# Altium PCB power-board.PcbDoc
Units mm, origin at the board's own origin, x right, y up, seen from the top; angles counter-clockwise.
Board outline 80 x 65 mm, 2 copper layers (Top Layer, Bottom Layer); 24 components, 14 nets, 67 pads, 3 vias.
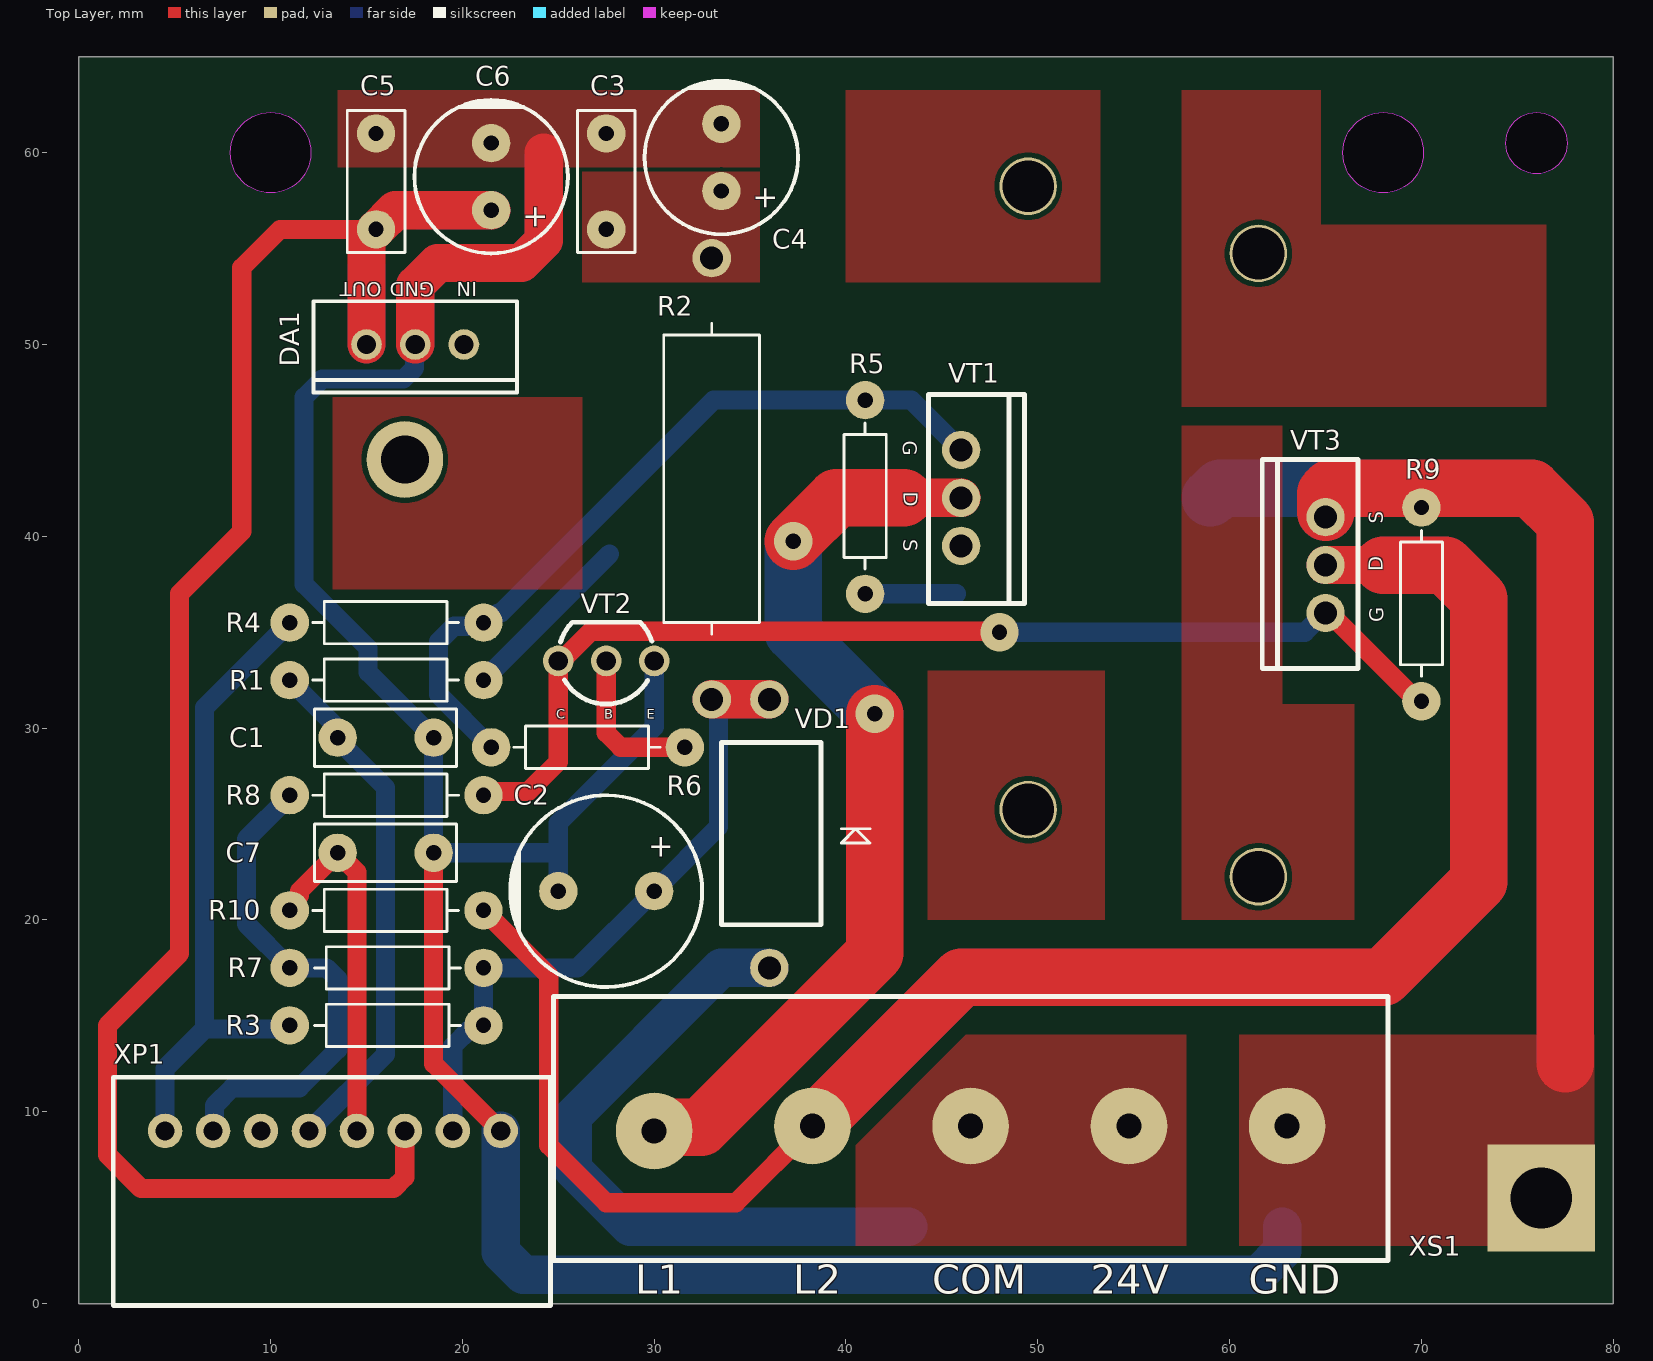
[diagram p0: Top Layer view]
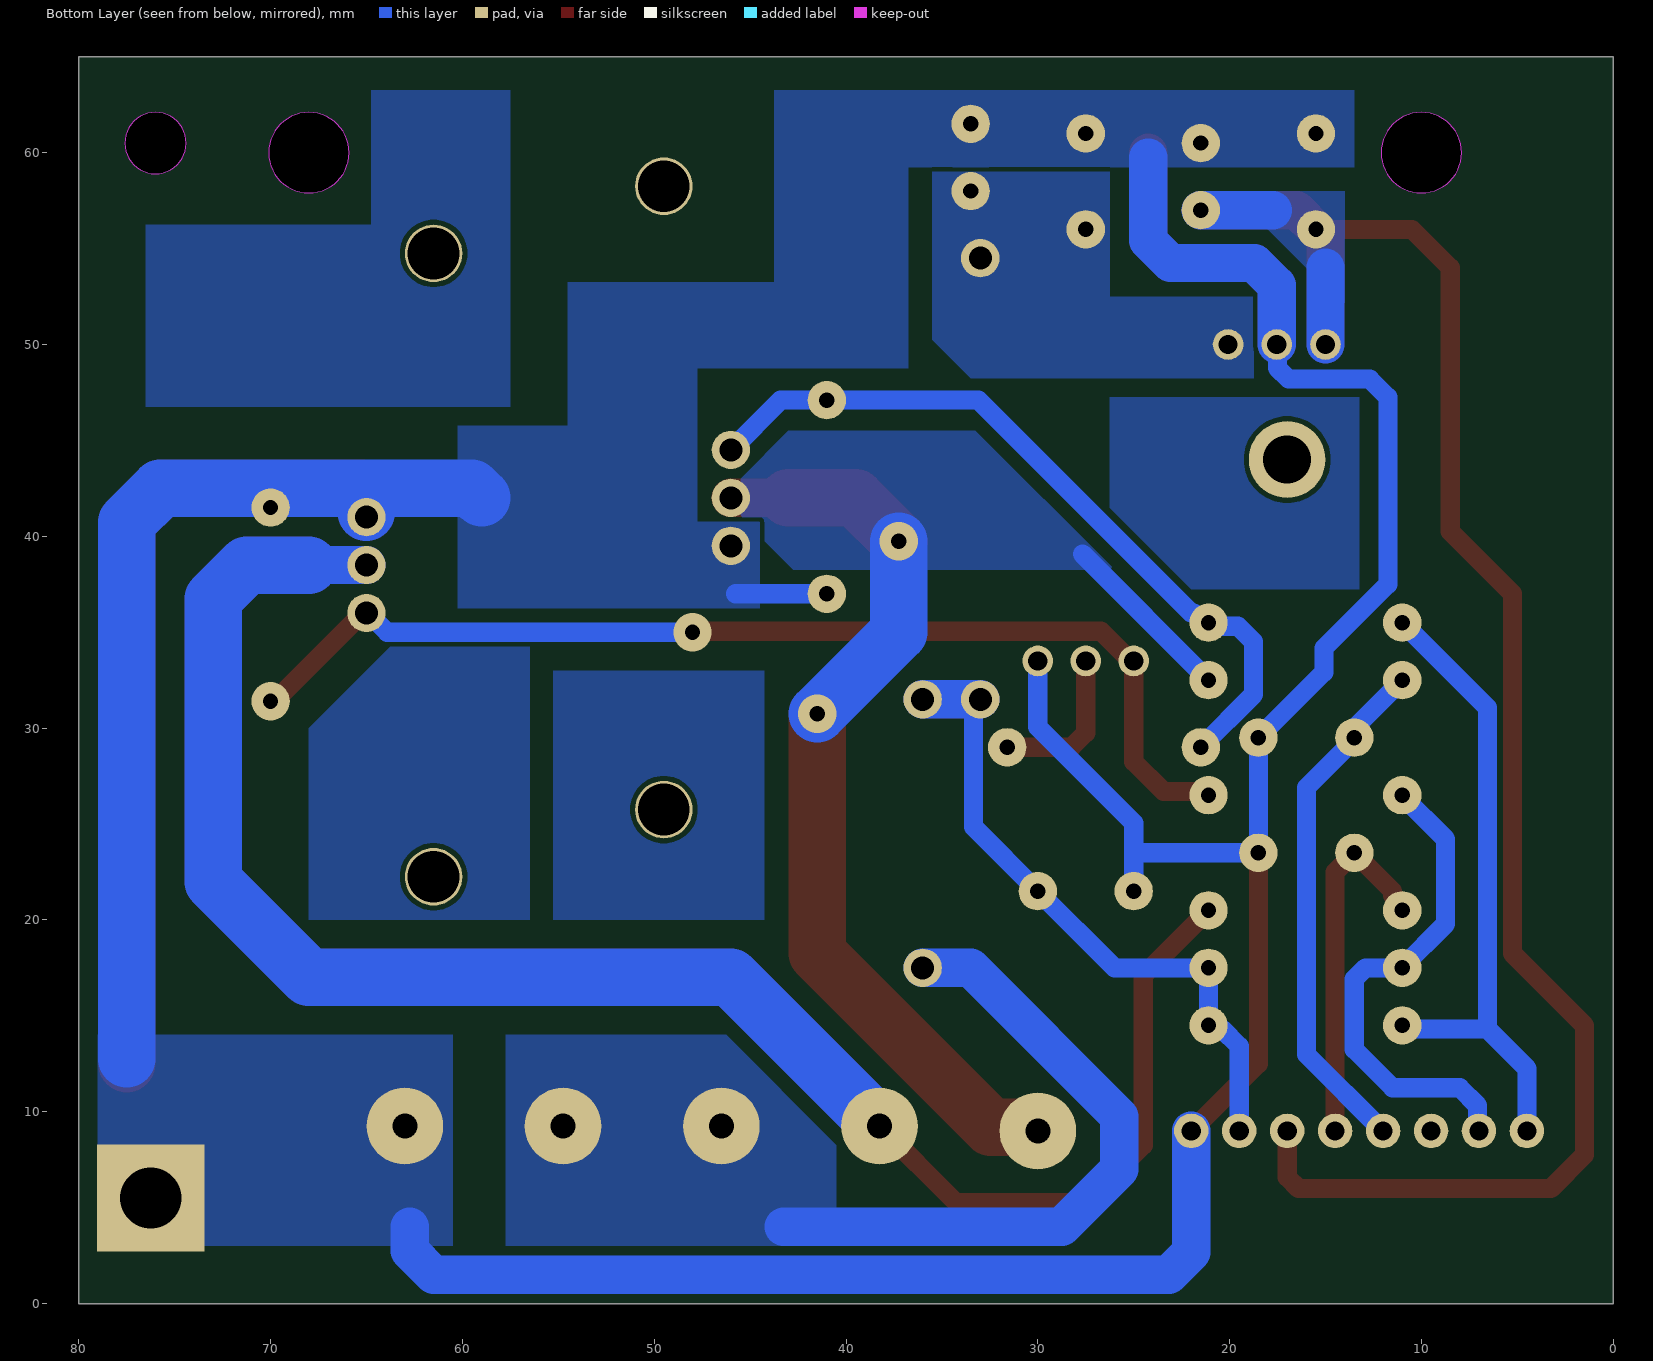
[diagram p1: Bottom Layer view, seen from below]
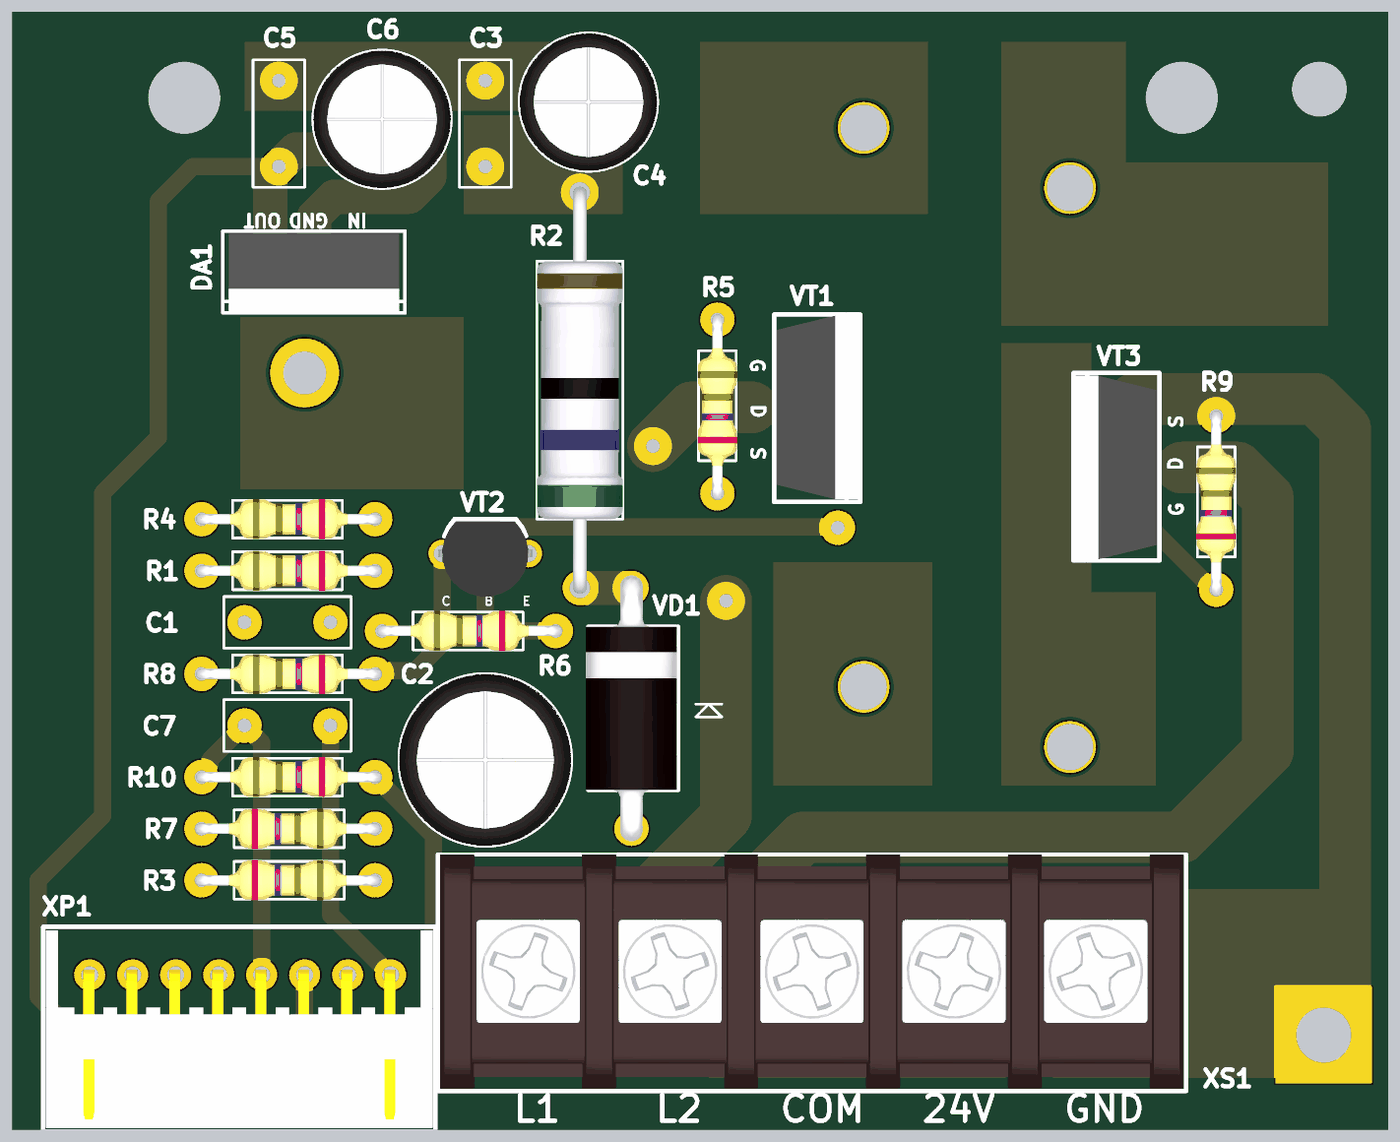
[diagram p2: 3D render of the assembled board from above, using the file's embedded part models]

## Layer stack, top to bottom
Top Solder: solder mask 0.0102, Solder Resist, Dk 3.5
Top Layer: signal copper 0.0356
Dielectric 1: dielectric 0.32, FR-4, Dk 4.8
Bottom Layer: signal copper 0.0356
Bottom Solder: solder mask 0.0102, Solder Resist, Dk 3.5

## Board outline
0,0 80,0 80,65 0,65
cut-out: 74.4,60.5 cw(c76,60.5) 76,62.1 cw(c76,60.5) 77.6,60.5 cw(c76,60.5) 76,58.9 cw(c76,60.5)
cut-out: 65.9,60 cw(c68,60) 68,62.1 cw(c68,60) 70.1,60 cw(c68,60) 68,57.9 cw(c68,57.9) 68,57.9 cw(c68,60)
cut-out: 7.9,60 cw(c10,60) 10,62.1 cw(c10,60) 12.1,60 cw(c10,60) 10,57.9 cw(c10,57.9) 10,57.9 cw(c10,60)

## Design rules (kind name [scope] priority, off if disabled: settings)
Clearance [All] p1: gap=0.25 ignorepadtopadclearanceinfootprint=FALSE
PolygonConnect [All] p1: connectstyle=Direct reliefconductorwidth=0.254 reliefentries=4 polygonreliefangle="90 Angle" airgapwidth=0.254
RoutingVias [All] p1: holewidth=0.711 width=1.27 viastyle="Through Hole" minholewidth=0.711 minwidth=1.27 maxholewidth=0.711 maxwidth=1.27
SolderMaskExpansion [All] p1: expansion=0.102 istentingtop=FALSE
Width "Width 1 Oz" [All] p1: maxlimit=10 minlimit=0.25 preferedwidth=1 checkconnectedcopper=TRUE
30 further rules are at their usual default settings.

## Components (designator, comment, footprint, x,y, rotation, side; value= is the part's Value field where it differs from the comment)
C1 "0.1 µF" C_MLCC 16,29.5 r180 top
C2 "470 µF" C_Polarized_D10_H16.5 27.5,21.5 r0 top
C3 "0.1 µF" C_MLCC 27.5,58.5 r270 top
C4 "330 µF" C_Polarized_D8_H16.5 33.5,59.75 r270 top
C5 "0.1 µF" C_MLCC 15.5,58.5 r270 top
C6 "470 µF" C_Polarized_D8_H13 21.5,58.75 r270 top
C7 "0.1 µF" C_MLCC 16,23.5 r180 top
DA1 "L7805CV-DG" DA_TO-220 17.54,50 r180 top
R1 "5.1 kΩ" R_CF-25_C1-4 16,32.5 r180 top
R2 "150 Ω" R_C2-23 33,43 r90 top
R3 "10 kΩ" R_CF-25_C1-4 16.1,14.5 r0 top
R4 "1 kΩ" R_CF-25_C1-4 16,35.5 r180 top
R5 "10 kΩ" R_CF-25_C1-4 41,42.1 r90 top
R6 "10 kΩ" R_CF-25_C1-4 26.5,29 r180 top
R7 "10 kΩ" R_CF-25_C1-4 16.1,17.5 r0 top
R8 "1 kΩ" R_CF-25_C1-4 16,26.5 r180 top
R9 "10 kΩ" R_CF-25_C1-4 70,36.5 r90 top
R10 "5.1 kΩ" R_CF-25_C1-4 16,20.5 r180 top
VD1 "1N5404" VD_DO-201AD 36,24.5 r90 top
VT1 "IRFZ48NPBF" VT_TO-220AB 46.7,42 r270 top
VT2 "2N5551" VT_TO-92 27.5,33.5 r0 top
VT3 "IRFZ48NPBF" VT_TO-220AB 64.3,38.5 r90 top
XP1 "L-KLS1-2.50-08-R" X_CWF-8R 13.2,5.6 r180 top
XS1 "DG35C-B-05P-13-200A(H)" X_DG35C-05PIN 46.5,9.25 r0 top

## Footprints (in the part's own frame and the unit in brackets; to place one, negate y for a bottom-side part, rotate by r counter-clockwise, add the part's x,y. Pads: shape width x height; smd on the part's side, far side on the other; paste and mask are expansions set on the pad)
C_MLCC [mm]
  round 2 hole 0.8: 1(-2.5,0) 2(2.5,0)
  silkscreen extent -3.7,-1.5 3.7,1.5, body extent -2.79,-1.25 2.79,1.25, height 7.5
C_Polarized_D8_H13 [mm] "8mm Diameter 3.5mm Lead Spacing Aluminum Electrolytic Capacitors Radial, Can"
  round 2 hole 0.8: 1(1.75,0) 2(-1.75,0)
  silkscreen extent -4,-4 4,4, body extent -4.01,-4 4,4, height 13
C_Polarized_D8_H16.5 [mm] "8mm Diameter 3.5mm Lead Spacing Aluminum Electrolytic Capacitors Radial, Can"
  round 2 hole 0.8: 1(1.75,0) 2(-1.75,0)
  silkscreen extent -4,-4 4,4, body extent -4.01,-4 4,4, height 16.5
C_Polarized_D10_H16.5 [mm] "10mm Diameter 5mm Lead Spacing Aluminum Electrolytic Capacitors Radial, Can"
  round 2 hole 0.8: 1(2.5,0) 2(-2.5,0)
  silkscreen extent -5,-5 5,5, body extent -5.01,-5 5,5, height 16.5
DA_TO-220 [mm] "TO, Thru-Hole, Vertical, Heatsink Mounted; 3 In-Line Leads; Pitch 2.54 mm"
  round 1.6 hole 1: 1(-2.54,0) 2(0,0) 3(2.54,0)
  silkscreen extent -5.3,-2.25 5.3,2.5, body extent -4.95,-2.1 4.95,2.4, height 19.8
R_C2-23 [mm]
  round 2 hole 1.2: 1(-11.5,0) 2(11.5,0)
  silkscreen extent -8.1,-2.5 8.1,2.5, body extent -11.83,-2.5 11.83,2.5, height 6.5
R_CF-25_C1-4 [mm]
  round 2 hole 0.8: 1(-5.1,0) 2(5,0)
  silkscreen extent -3.8,-1.1 3.8,1.1, body extent -5.47,-1.16 5.3,1.16, height 2.93
VD_DO-201AD [mm]
  round 2 hole 1.2: 1(-7,0) 2(7,0)
  silkscreen extent -4.75,-5.25 4.75,2.5, body extent -7.73,-2.64 7.73,2.64, height 5.65
VT_TO-92 [mm]
  round 1.6 hole 1: 1(-2.5,0) 2(0,0) 3(2.5,0)
  silkscreen extent -2.39,-2.25 2.38,2.02, body extent -2.75,-2.5 2.75,1.85, height 7.2
VT_TO-220AB [mm]
  round 2 hole 1.2: 1(2.5,-0.7) 2(-2.5,-0.7) 3(0,-0.7)
  silkscreen extent -5.4,-2.4 5.5,2.6, body extent -5.35,-2.25 5.35,2.56, height 21.58
X_CWF-8R [mm]
  round 1.8 hole 1: 1(8.7,-3.4) 2(6.2,-3.4) 3(3.7,-3.4) 4(1.2,-3.4) 5(-1.3,-3.4) 6(-3.8,-3.4) 7(-6.3,-3.4) 8(-8.8,-3.4)
  silkscreen extent -11.4,-6.2 11.4,5.7, body extent -11.25,-6 11.25,5.5, height 5.75
X_DG35C-05PIN [mm]
  round 4 hole 1.3: 1(-16.5,-0.25) 2(-8.25,0) 3(0,0) 4(8.25,0) 5(16.5,0)
  silkscreen extent -21.75,-7 21.75,6.75, body extent -21.63,-6.85 21.63,6.75, height 15.1

## Part data
C1 C3 C5 C7: library part C_NonPolarized, "Ceramic capacitor, 50 V, 20%"
C2 C4: library part C_Polarized, "Aluminum electrolytic capacitor, 35 V, 20%"
C6: library part C_Polarized, "Aluminum electrolytic capacitor, 16 V, 20%"
DA1: library part DA_Voltage_Regulator, "Linear voltage regulator, +5 V"
R1 R3 R4 R5 R6 R7 R8 R9 R10: library part R_RESISTOR, "Resistor, 0.25 W, 5%"
R2: library part R_RESISTOR, "Resistor, 2 W, 5%"
VD1: library part VD_Diode, "Rectifier diode"
VT1 VT3: library part VT_MOSFET-N, "N-channel MOSFET"
VT2: library part VT_Bipolar-NPN, "NPN bipolar transistor"
XP1: library part XP_Connector_8Pin, "8-position connector"
XS1: library part XS_Connector_5Pin, "5-position terminal block"

## Free pads (board coordinates)
  round 4 hole 2.5: S(17,44)
  round 3 hole 2.7: S(49.5,25.75) S(49.5,58.25) S(61.5,22.25) S(61.5,54.75)
  rect 5.6x5.6 hole 3.2: S(76.25,5.5)

## Via types
v1: diameter 2, hole 0.8, Top Layer to Bottom Layer, 3 vias

## Nets (pads, with @x,y where several pads share a name; then routed paths per layer and width w, separated by ;. In a path a pad name is that pad's centre, name@x,y a point inside that pad or via, vN(x,y) a via of type N, cw(c..) or ccw(c..) an arc to the next point about the centre after c; other vN are vias at no path point)
GND: C1.1 C2.2 C3.1 C4.2 C5.1 C6.2 C7.1 DA1.2 pad.S@76.25,5.5 R5.1 R9.2 VT1.1 VT2.3 VT3.1 XP1.8 XS1.5 | length 246.5
  Top Layer w1: C7.1 18.5,12.5 XP1.8
  Top Layer w2: DA1.2 17.54,53.078 18.712,54.25 23.078,54.25 24.25,55.422 24.25,60
  Top Layer w3: VT3.1@65,41.25 65,42.25 65.25,42.5 75.743,42.5 77.5,40.743 77.5,12.5
  Bottom Layer w1: DA1.2 17.509,49.969 17.509,48.778 16.924,48.192 12.692,48.192 11.75,47.25 11.75,37.5 15.087,34.163 15.087,32.913 C1.1 C7.1 25,23.5 ; C2.2 25,23.5 ; VT2.3 30,30.054 25,25.054 25,23.5 ; R5.1 45.75,37
  Bottom Layer w2: DA1.2 17.54,53.078 18.712,54.25 23.078,54.25 24.25,55.422 24.25,59.75 ; XP1.8 22,2.672 23.172,1.5 61.5,1.5 62.75,2.75 62.75,4
  Bottom Layer w3: 59,42 59.5,42.5 65,42.5 ; VT3.1@65,41.25 65,42.5 ; 77.5,12.75 77.5,40.743 75.743,42.5 65,42.5
NetC1_2: C1.2 R1.2 XP1.4 | length 27.2
  Bottom Layer w1: R1.2 13.423,30.077 13.423,29.577 C1.2 13.5,29.392 16,26.892 16,13 XP1.4
NetC2_1: C2.1 R2.1 R3.2 R7.2 VD1.2 XP1.7 | length 36.8
  Top Layer w2: R2.1 VD1.2
  Bottom Layer w1: XP1.7 19.5,13.414 R3.2@20.394,14.309 ; R3.2 R7.2 26,17.5 C2.1 33.35,24.85 33.35,30.879 33,31.229 R2.1
  Bottom Layer w2: R2.1 VD1.2
NetC3_2: C3.2 C4.1 DA1.1 R2.2
NetC5_2: C5.2 C6.1 DA1.3 XP1.6 | length 96.2
  Top Layer w1: C5.2 10.5,56 8.5,54 8.5,40.25 5.25,37 5.25,18.25 1.5,14.5 1.5,7.75 3.25,6 16.414,6 17,6.586 XP1.6
  Top Layer w2: DA1.3 15,55.5 C5.2 16.5,57 C6.1
  Bottom Layer w2: DA1.3 15,54 ; 17.75,57 C6.1
NetC7_2: C7.2 R10.2 XP1.5 | length 18.8
  Top Layer w1: R10.2 11,20.771 11.5,21.271 11.5,21.5 C7.2 ; C7.2@13.631,23.369 14.5,22.5 XP1.5
NetR1_1: R1.1 VT1.3 XS1.1 | length 57.6
  Top Layer w2: 43,42 VT1.3
  Top Layer w3: XS1.1 30.191,9.191 32.441,9.191 41.5,18.25 v1(41.5,30.75) ; v1(37.25,39.75) 39.5,42 43,42
  Bottom Layer w1: R1.1 27.675,39.075
  Bottom Layer w3: v1(37.25,39.75) 37.25,35 v1(41.5,30.75)
NetR3_1: R3.1 R4.2 XP1.1 | length 33.7
  Bottom Layer w1: XP1.1 4.5,12.25 6.559,14.309 ; R3.1 10.809,14.309 6.559,14.309 ; R4.2 6.559,31.059 6.559,14.309
NetR4_1: R4.1 R5.2 R6.2 VT1.2 | length 40.2
  Bottom Layer w1: R6.2 18.75,31.75 18.75,34.5 19.559,35.309 20.909,35.309 R4.1 21.371,35.5 21.871,36 22,36 33.1,47.1 R5.2 43.4,47.1 VT1.2
NetR6_1: R6.1 VT2.2 | length 8.2
  Top Layer w1: VT2.2 27.5,29.75 28.25,29 R6.1
NetR7_1: R7.1 R8.2 XP1.2 | length 26.3
  Bottom Layer w1: XP1.2 7.072,9.072 7.072,10.322 8,11.25 11.5,11.25 13.5,13.25 13.5,16.914 12.914,17.5 R7.1 11,17.536 8.75,19.786 8.75,24.214 11,26.464 R8.2
NetR8_1: R8.1 R9.1 VT2.1 VT3.2 | length 57.9
  Top Layer w1: R8.1 21.291,26.691 23.441,26.691 25,28.25 VT2.1 25.153,33.5 26.703,35.05 47.95,35.05 v1(48,35) ; VT3.2 65.2,36 69.8,31.4 R9.1
  Bottom Layer w1: v1(48,35) 63.914,35 64.914,36 VT3.2
NetR10_1: R10.1 VT3.3 XS1.2 | length 157.3
  Top Layer w1: R10.1 24.5,17.1 24.5,8.25 27.5,5.25 34.25,5.25 XS1.2
  Top Layer w2: VT3.3 68,38.5
  Top Layer w3: XS1.2 46,17 68,17 73,22 73,36.743 71.243,38.5 68,38.5
  Bottom Layer w2: VT3.3 68,38.5
  Bottom Layer w3: XS1.2 46,17 68,17 73,22 73,36.743 71.243,38.5 68,38.5
NetVD1_1: VD1.1 XS1.3 XS1.4 | length 35
  Bottom Layer w2: VD1.1 33.5,17.5 25.75,9.75 25.75,7 28.75,4 43.25,4
pads on no net: XP1.3

## Polygon pours and split planes (outlines as drawn)
no net on Top Layer "NONET_L01_P008" (solid, pour order 8): 40,63.25 40,53.25 53.25,53.25 53.25,63.25
GND on Top Layer "GND_L01_P000" (solid, pour order 0): 35.5,63.25 13.5,63.25 13.5,59.25 35.5,59.25 13.5,59.25 35.5,59.25
NetC3_2 on Top Layer "NETC3_2_L01_P001" (solid, pour order 1): 26.25,59 35.5,59 35.5,53.25 26.25,53.25
NetVD1_1 on Top Layer "NETVD1_1_L01_P002" (solid, pour order 2): 40.5,3 40.5,8.25 46.25,14 57.75,14 57.75,3
GND on Top Layer "GND_L01_P003" (solid, pour order 3): 60.5,14 79,14 79,3 60.5,3
NetR1_1 on Top Layer "NETR1_1_L01_P004" (solid, pour order 4): 44.25,33 53.5,33 53.5,20 44.25,20
no net on Top Layer "NONET_L01_P007" (solid, pour order 7): 57.5,45.75 57.5,20 66.5,20 66.5,31.25 62.75,31.25 62.75,45.75
no net on Top Layer "NONET_L01_P009" (solid, pour order 9): 57.5,63.25 57.5,46.75 76.5,46.75 76.5,56.25 64.75,56.25 64.75,63.25
no net on Top Layer "NONET_L01_P010" (solid, pour order 10): 13.25,47.25 13.25,37.25 26.25,37.25 26.25,47.25
GND on Bottom Layer "GND_L02_P014" (solid, pour order 14): 35.5,59.255 35.505,59.25 36.75,59.25 36.75,48.75 47.75,48.75 47.75,40.75 44.5,40.75 44.5,36.25 60.25,36.25 60.25,45.75 54.5,45.75 54.5,53.25 43.75,53.25 43.75,63.25 35.5,63.25
GND on Bottom Layer "GND_L02_P018" (solid, pour order 18): 60.5,14 79,14 79,3 60.5,3
NetR1_1 on Bottom Layer "NETR1_1_L02_P017" (solid, pour order 17): 26,38.25 33.25,45.5 43,45.5 45.5,43 45.5,41 42.75,38.25
NetVD1_1 on Bottom Layer "NETVD1_1_L02_P011" (solid, pour order 11): 40.5,3 40.5,8.25 46.25,14 57.75,14 57.75,3
NetC3_2 on Bottom Layer "NETC3_2_L02_P012" (solid, pour order 12): 18.75,48.25 18.75,52.5 26.25,52.5 26.25,59 35.5,59 35.5,50.25 33.5,48.25
GND on Bottom Layer "GND_L02_P013" (solid, pour order 13): 13.5,63.25 13.5,59.25 35.5,59.25 35.5,63.25
no net on Bottom Layer "NONET_L02_P015" (solid, pour order 15): 57.5,63.25 64.75,63.25 64.75,56.25 76.5,56.25 76.5,46.75 57.5,46.75
no net on Bottom Layer "NONET_L02_P016" (solid, pour order 16): 13.25,47.25 26.25,47.25 26.25,41.5 22,37.25 13.25,37.25
NetR1_1 on Bottom Layer "NETR1_1_L02_P019" (solid, pour order 19): 44.25,33 55.25,33 55.25,20 44.25,20
no net on Bottom Layer "NONET_L02_P021" (solid, pour order 21): 56.5,34.25 56.5,20 68,20 68,30 63.75,34.25
NetC5_2 on Bottom Layer "NETC5_2_L02_P022" (solid, pour order 22): 14,58 14,52 20,58

## Silkscreen, mask and mechanical layers (free items; w line width, h text height)
Mechanical 13:
  circle w0.15: c10,60 r2.1
  circle w0.15: c76,60.5 r1.6
  circle w0.15: c68,60 r2.1

## Text inside footprints (layer, text, board x,y; h text height)
C2: Top Overlay "+" at 29.7,22.9 h2
C4: Top Overlay "+" at 34.9,58.3 h2 r270
C6: Top Overlay "+" at 22.9,57.3 h2 r270
DA1: Top Overlay "OUT" at 15.786,53.246 h0.75 r180; Top Overlay "GND" at 18.536,53.246 h0.75 r180; Top Overlay "IN" at 20.786,53.246 h0.75 r180
VT1: Top Overlay "S" at 42.979,39.846 h0.75 r270; Top Overlay "D" at 43.004,42.321 h0.75 r270; Top Overlay "G" at 42.954,44.971 h0.75 r270
VT2: Top Overlay "E" at 29.6,30.5 h0.5; Top Overlay "C" at 24.9,30.5 h0.5; Top Overlay "B" at 27.4,30.5 h0.5
VT3: Top Overlay "S" at 68.021,40.654 h0.75 r90; Top Overlay "D" at 67.996,38.179 h0.75 r90; Top Overlay "G" at 68.046,35.529 h0.75 r90
XS1: Top Overlay "GND" at 61.004,0.504 h1.52; Top Overlay "COM" at 44.504,0.504 h1.52; Top Overlay "L2" at 37.254,0.504 h1.52; Top Overlay "L1" at 29.004,0.504 h1.52; Top Overlay "24V" at 52.754,0.504 h1.52